# Altium PCB R6Drone.PcbDoc
Units mm, origin at the board's own origin, x right, y up, seen from the top; angles counter-clockwise.
Board outline 40.77 x 57.78 mm, 2 copper layers (Top Layer, Bottom Layer); 40 components, 21 nets, 94 pads, 36 vias.
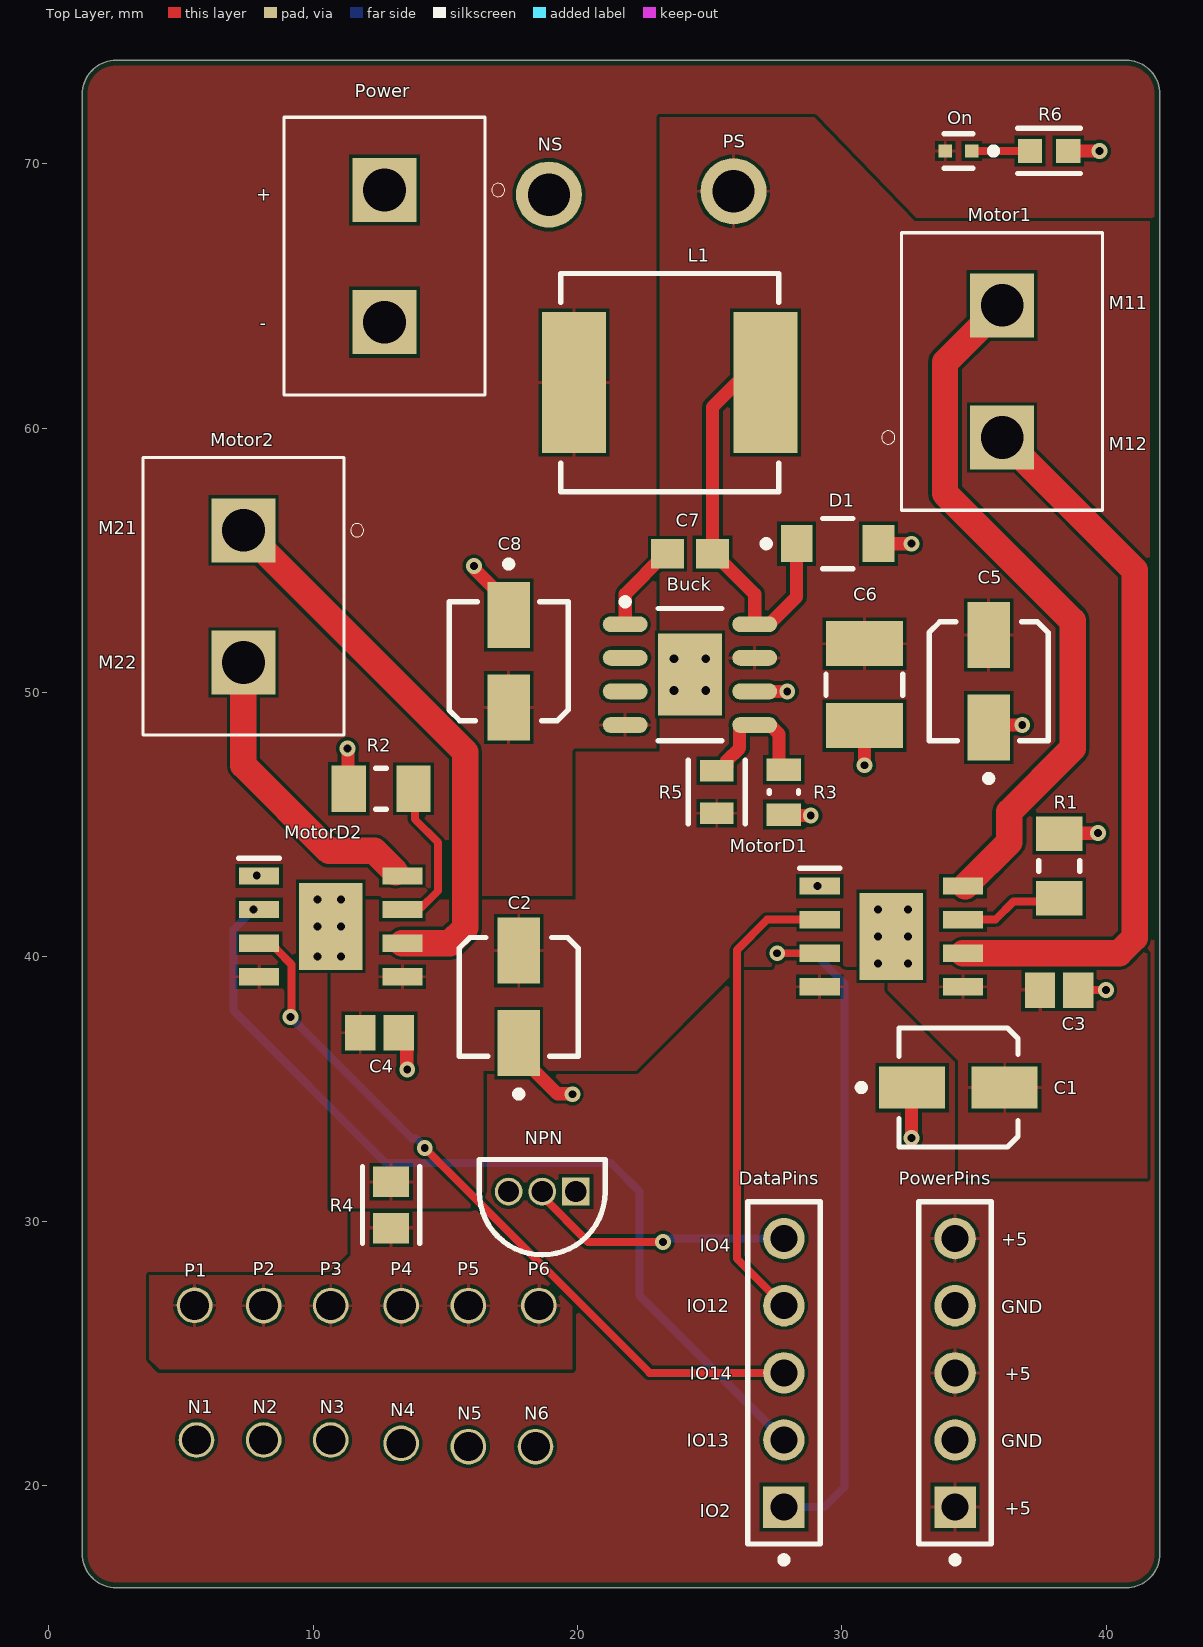
[diagram p0: Top Layer view]
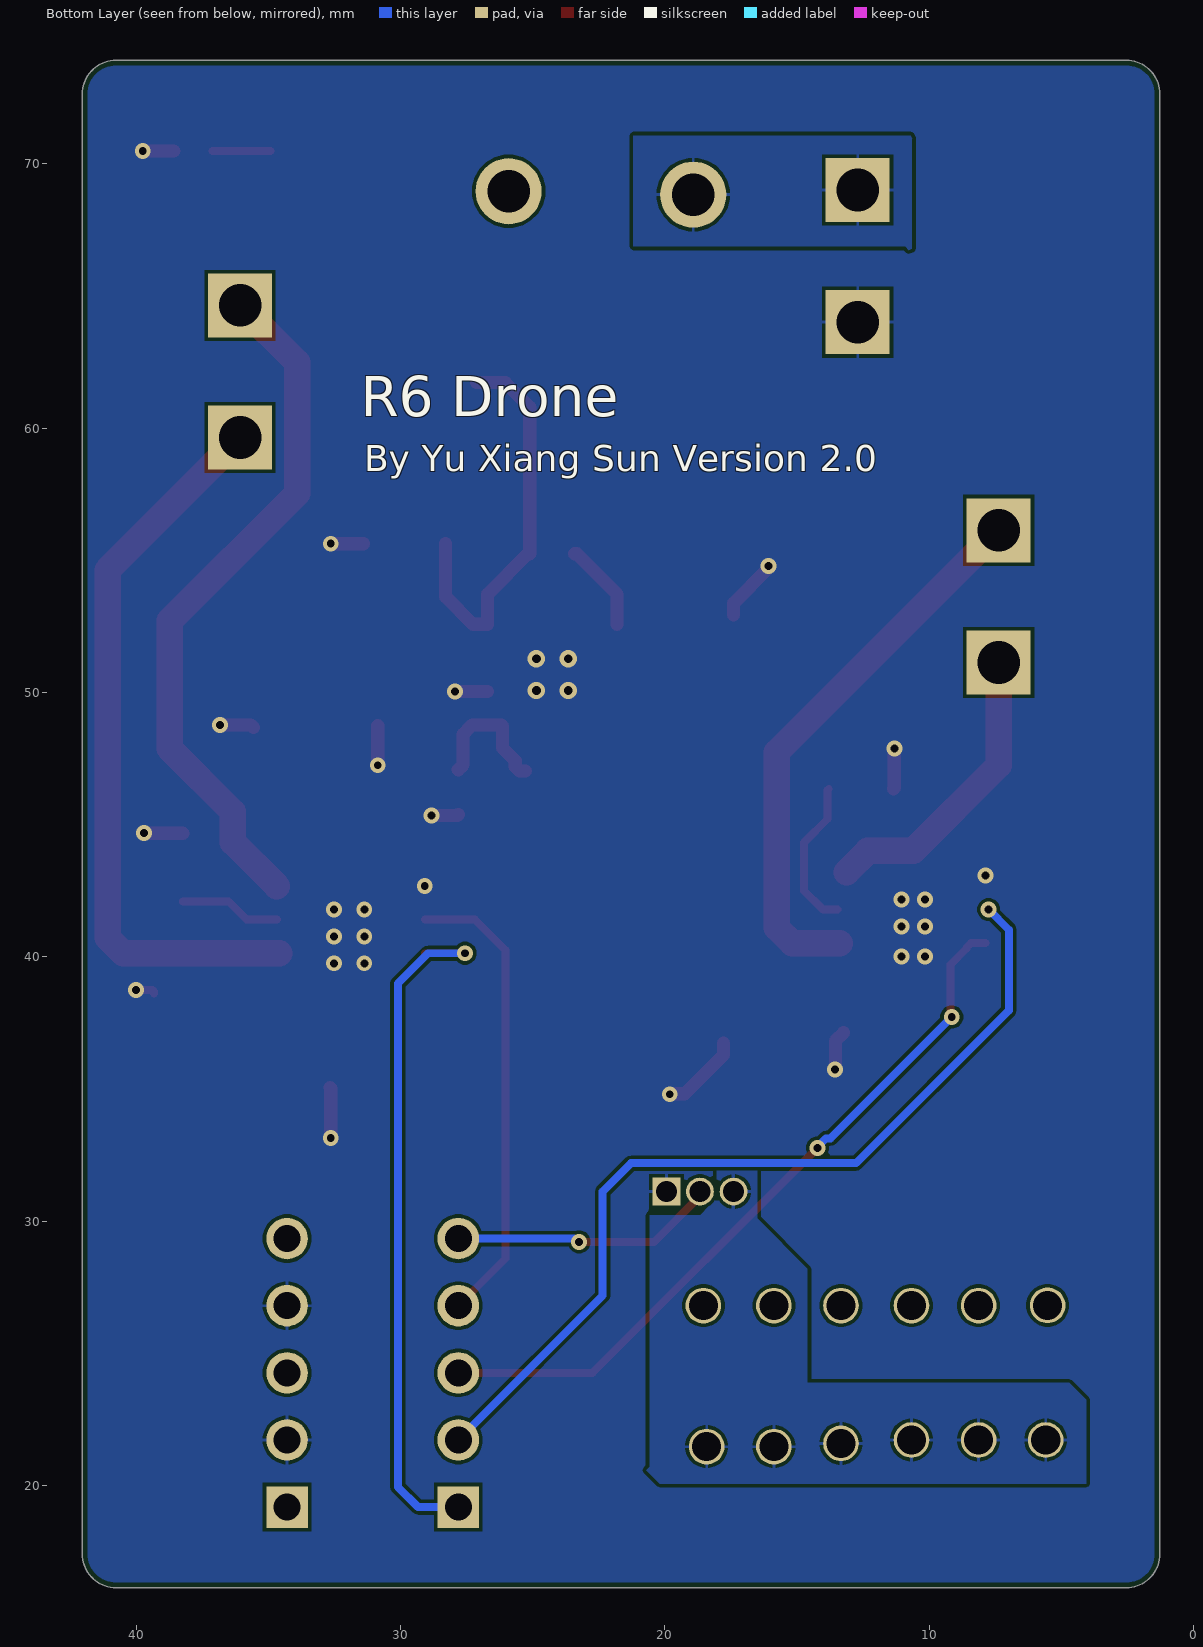
[diagram p1: Bottom Layer view, seen from below]
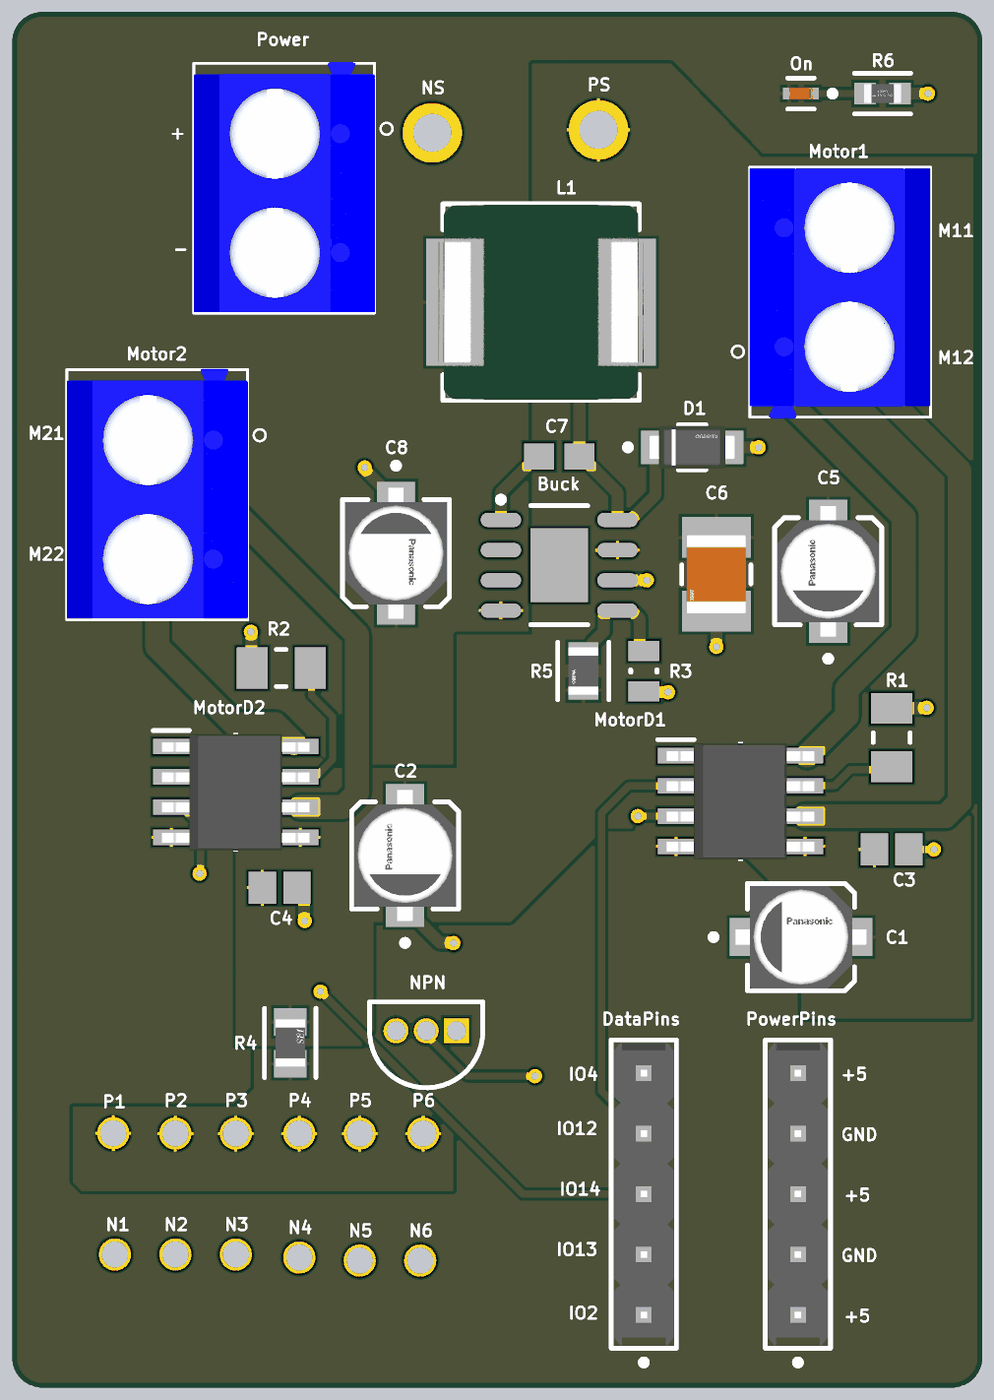
[diagram p2: 3D render of the assembled board from above, using the file's embedded part models]

## Layer stack, top to bottom
Top Solder: solder mask 0.0102, Solder Resist, Dk 3.5
Top Layer: signal copper 0.0356
Dielectric 1: dielectric 0.32, FR-4, Dk 4.8
Bottom Layer: signal copper 0.0356
Bottom Solder: solder mask 0.0102, Solder Resist, Dk 3.5

## Board outline
2.54,16.129 cw(c2.54,17.399) 1.27,17.399 1.27,72.644 cw(c2.54,72.644) 2.54,73.914 40.767,73.914 cw(c40.767,72.644) 42.037,72.644 42.037,17.399 cw(c40.767,17.399) 40.767,16.129

## Design rules (kind name [scope] priority, off if disabled: settings)
BoardOutlineClearance [All] p1: gap=0.2 ignorepadtopadclearanceinfootprint=FALSE
Clearance [All] p1: gap=0.127 ignorepadtopadclearanceinfootprint=FALSE except(0.25: Arc-Hole Track-Hole SMDPad-Hole THPad-Hole Via-Hole Fill-Hole Poly-Hole Region-Hole Text-Hole)
ComponentClearance [All] p1: gap=0.127 collisioncheckmode=3 verticalgap=0.127 showdistances=TRUE
DiffPairsRouting [All] p1: maxlimit=0.254 minlimit=0.127 mostfreqgap=0.127 toplayer_minwidth=0.127 toplayer_maxwidth=25.4 toplayer_prefwidth=0.127 bottomlayer_minwidth=0.127 bottomlayer_maxwidth=25.4 bottomlayer_prefwidth=0.127 maxuncoupledlength=12.7
Height [All] p1: minheight=0 maxheight=1816.048 prefheight=12.7
HoleSize [All] p1: absolutevalues=TRUE maxlimit=6.3 minlimit=0.3 maxpercent=80.000 minpercent=20.000
HoleToHoleClearance [All] p1: gap=0.25 allowstackedmicrovias=FALSE
MinimumAnnularRing [All] p1: minimumring=0.076
MinimumSolderMaskSliver [All] p1: minsoldermaskwidth=0
PlaneClearance [All] p1: clearance=0.127
PlaneConnect PlaneConnectPowerPads [InPadClass('PowerPads')] p1: planeconnectstyle=Direct reliefexpansion=0.508 reliefentries=4 reliefconductorwidth=0.254 reliefairgap=0.254
PlaneConnect [All] p2: pad.planeconnectstyle=Relief pad.reliefexpansion=0.3 pad.reliefentries=4 pad.reliefconductorwidth=0.127 pad.reliefairgap=0.127 via.planeconnectstyle=Direct via.reliefexpansion=0.3 via.reliefentries=4 via.reliefconductorwidth=0.127 via.reliefairgap=0.127
PolygonConnect PolygonConnectPowerPads [All vs (InPadClass('PowerPads'))] p1: connectstyle=Direct reliefconductorwidth=0.254 reliefentries=4 polygonreliefangle="90 Angle" airgapwidth=0.254
PolygonConnect [All] p2: thpad.connectstyle=Relief thpad.reliefconductorwidth=0.127 thpad.reliefentries=4 thpad.polygonreliefangle="90 Angle" thpad.airgapwidth=0.127 smdpad.connectstyle=Relief smdpad.reliefconductorwidth=0.127 smdpad.reliefentries=4 smdpad.polygonreliefangle="90 Angle" smdpad.airgapwidth=0.127 via.connectstyle=Direct via.reliefconductorwidth=0.127 via.reliefentries=4 via.polygonreliefangle="90 Angle" via.airgapwidth=0.127
RoutingVias [All] p1: holewidth=0.3 width=0.6 viastyle="Through Hole" minholewidth=0.3 minwidth=0.6 maxholewidth=0.6 maxwidth=6.6
SilkToSilkClearance [All] p1: silktosilkclearance=0
SilkToSolderMaskClearance [IsPad] p1: minsilkscreentomaskgap=0.127 clearancetoexposedcopper=TRUE
SolderMaskExpansion [All] p1: expansion=0.075 istentingtop=FALSE
SupplyNets "Schematic Supply Nets_2" [InNet('+5')] p1: voltage=0.000
SupplyNets "Schematic Supply Nets_1" [InNet('+9')] p2: voltage=0.000
SupplyNets "Schematic Supply Nets" [InNet('GND')] p3: voltage=0.000
Width [All] p1: maxlimit=25.4 minlimit=0.127 preferedwidth=0.127 minimp=50.000000 maximp=50.000000 favimp=50.000000
20 further rules are at their usual default settings.

## Components (designator, comment, footprint, x,y, rotation, side; value= is the part's Value field where it differs from the comment)
Buck "LM22675QMRE-5.0/NOPB" MRA08B_L 24.257,50.673 r0 top
C1 "100u" FP-FTB-MFG 34.417,35.052 r0 top
C2 "100u" FP-FTB-MFG 17.78,38.481 r90 top
C3 "0.22u" CAPC2013X94X50LL20T25 38.227,38.735 r180 top
C4 "0.22u" CAPC2013X94X50LL20T25 12.509,37.124 r180 top
C5 "100u" FP-FTB-MFG 35.56,50.419 r90 top
C6 "10u" FP-1210-L_3_3_0_4-W_2_5_0-IPC_A 30.861,50.292 r270 top
C7 "10n" CAPC1608X90X35ML15T15 24.257,55.245 r180 top
C8 "100u" FP-FTB-MFG 17.399,51.181 r270 top
D1 "15v 2A" FP-425AB-MFG 29.845,55.626 r0 top
DataPins "Data" FP-22-28-4050-MFG 27.813,24.257 r90 top
L1 "10u" FP-IHLP-3232CZ-FP_2_413x5-MFG 23.495,61.722 r180 top
Motor1 "EBBA-02-C-SS-BU" EBBA-02-C-SS-BU 36.068,59.643 r90 top
Motor2 "EBBA-02-C-SS-BU" EBBA-02-C-SS-BU 7.366,56.134 r270 top
MotorD1 "A4950KLJTR-T" SOIC127P600X170-9N 31.877,40.767 r0 top
MotorD2 "A4950KLJTR-T" SOIC127P600X170-9N 10.668,41.148 r0 top
N1 "Con1.1mm" "PCBComponent_1 - duplicate" 5.08,21.209 r0 top
N2 "Con1.1mm" "PCBComponent_1 - duplicate" 7.62,21.209 r0 top
N3 "Con1.1mm" "PCBComponent_1 - duplicate" 10.16,21.209 r0 top
N4 "Con1.1mm" "PCBComponent_1 - duplicate" 12.827,21.082 r0 top
N5 "Con1.1mm" "PCBComponent_1 - duplicate" 15.367,20.955 r0 top
N6 "Con1.1mm" "PCBComponent_1 - duplicate" 17.907,20.955 r0 top
NPN "2N3904BU" FAIR-TO-92 19.939,31.115 r180 top
NS "2mm hole" PCBComponent_1 18.923,68.834 r0 top
On "Red" FP-HSMC-C280-MFG 34.417,70.485 r180 top
P1 "Con1.1mm" "PCBComponent_1 - duplicate" 5.009,26.304 r0 top
P2 "Con1.1mm" "PCBComponent_1 - duplicate" 7.62,26.289 r0 top
P3 "Con1.1mm" "PCBComponent_1 - duplicate" 10.16,26.289 r0 top
P4 "Con1.1mm" "PCBComponent_1 - duplicate" 12.827,26.289 r0 top
P5 "Con1.1mm" "PCBComponent_1 - duplicate" 15.367,26.289 r0 top
P6 "Con1.1mm" "PCBComponent_1 - duplicate" 18.034,26.289 r0 top
Power "EBBA-02-C-SS-BU" EBBA-02-C-SS-BU 12.7,69.008 r270 top
PowerPins "Power" FP-22-28-4050-MFG 34.29,24.257 r90 top
PS "2mm hole" PCBComponent_1 25.908,68.961 r0 top
R1 "0.15" RESC3216X89X64LL25T25 38.227,43.434 r90 top
R2 "0.15" RESC3216X89X64LL25T25 12.573,46.355 r180 top
R3 "240k" RESC0805(2012)_L 27.813,46.228 r90 top value="240000.00 Ohm"
R4 "30" FP-RMCF0805-IPC_B 12.954,30.607 r90 top
R5 "470k" FP-AT0805-IPC_C 25.273,46.228 r270 top
R6 "10k" FP-RQ731J-IPC_B 37.846,70.485 r0 top

## Footprints (in the part's own frame and the unit in brackets; to place one, negate y for a bottom-side part, rotate by r counter-clockwise, add the part's x,y. Pads: shape width x height; smd on the part's side, far side on the other; paste and mask are expansions set on the pad)
CAPC1608X90X35ML15T15 [mm] "Chip Capacitor, 2-Leads, Body 1.60x0.81mm, IPC Low Density"
  rect 1.25x1.1 smd: 1(-0.85,0) 2(0.85,0)
  body extent -0.88,-0.48 0.87,0.48, height 0.9
CAPC2013X94X50LL20T25 [mm] "Chip Capacitor, 2-Leads, Body 2.01x1.25mm, IPC High Density"
  rect 1.15x1.35 smd: 1(-0.725,0) 2(0.725,0)
  body extent -1.1,-0.72 1.1,0.72, height 0.94
EBBA-02-C-SS-BU [mm]
  rect 2.421x2.421 / inner round 2.421 / far side rect 2.421x2.421 hole 1.614: 1(0,0) 2(5,0)
  silkscreen extent -2.75,-3.8 7.75,4.55, body extent -2.79,-3.79 7.71,3.81, height 10
FAIR-TO-92 [mm] "TO, 3-Leads, Body Dia 4.79mm, Pitch 1.27mm"
  rect 1.05x1.05 hole 0.8 mask+0.05: 1(0,0)
  round 1.05 hole 0.8 mask+0.05: 2(1.27,0) 3(2.54,0)
  silkscreen extent -1.11,-1.21 3.65,2.4, body extent -1.11,-1.21 3.65,2.4, height 5.33
FP-22-28-4050-MFG [mm]
  rect 1.57x1.57 hole 1.02 paste-2539.97 mask+0: 1(-5.08,0)
  round 1.57 hole 1.02 paste-2539.97 mask+0: 2(-2.54,0) 3(0,0) 4(2.54,0) 5(5.08,0)
  silkscreen extent -7.2,-1.37 6.48,1.37, body extent -6.58,-1.47 6.58,1.47, height 0.25
FP-425AB-MFG [mm]
  rect 1.2x1.4 smd paste+0 mask+0: 1(-1.55,0) 2(1.55,0)
  silkscreen extent -2.82,-0.95 0.58,0.95, body extent -2.25,-1.05 2.25,1.05, height 0.25
FP-1210-L_3_3_0_4-W_2_5_0-IPC_A [mm]
  rect 1.703x2.904 smd paste+0 mask+0: 1(-1.55,0) 2(1.55,0)
  silkscreen extent -0.4,-1.45 0.4,1.45, body extent -2.9,-1.95 2.9,1.95, height 0.25
FP-AT0805-IPC_C [mm]
  rect 0.808x1.262 smd paste+0 mask+0: 1(-0.802,0) 2(0.802,0)
  silkscreen extent -1.21,-1.07 1.21,1.07, body extent -1.31,-0.77 1.31,0.77, height 0.25
FP-FTB-MFG [mm]
  rect 2.5x1.6 smd paste+0 mask+0: 1(-1.75,0) 2(1.75,0)
  silkscreen extent -3.8,-2.25 2.25,2.25, body extent -3.25,-2.5 3.25,2.5, height 0.25
FP-HSMC-C280-MFG [mm]
  rect 0.5x0.5 smd paste+0 mask+0: 1(-0.5,0) 2(0.5,0)
  silkscreen extent -1.45,-0.65 0.55,0.65, body extent -0.85,-0.4 0.85,0.4, height 0.25
FP-IHLP-3232CZ-FP_2_413x5-MFG [mil]
  rect 95x210 smd paste+0 mask+0: 1(-142.5,0) 2(142.5,0)
  silkscreen extent -163,-163 163,163, body extent -194,-166 194,166, height 10
FP-RMCF0805-IPC_B [mm]
  rect 1.155x1.362 smd paste+0 mask+0: 1(-0.876,0) 2(0.876,0)
  silkscreen extent -1.45,-1.08 1.45,1.08, body extent -1.7,-0.93 1.7,0.93, height 0.25
FP-RQ731J-IPC_B [mm]
  rect 0.91x0.912 smd paste+0 mask+0: 1(-0.726,0) 2(0.726,0)
  silkscreen extent -1.18,-0.86 1.18,0.86, body extent -1.43,-0.71 1.43,0.71, height 0.25
MRA08B_L [mm] "SOIC, 8-Leads, Body 4.9x3.9mm, Pitch 1.27mm, Exposed Pad, IPC High Density"
  oval 1.7x0.6 smd: 1(-2.45,1.905) 2(-2.45,0.635) 3(-2.45,-0.635) 4(-2.45,-1.905) 5(2.45,-1.905) 6(2.45,-0.635) 7(2.45,0.635) 8(2.45,1.905)
  rect 2.41x3.1 smd: 9(0,0)
  silkscreen extent -2.57,-2.5 1.2,2.88, body extent -2,-2.5 2,2.5, height 1.68
PCBComponent_1 [mm]
  round 2.5 hole 1.6: 1(0,0)
"PCBComponent_1 - duplicate" [mm]
  round 1.35 hole 1.1: 1(0.508,0.508)
RESC0805(2012)_L [mm] "Chip Resistor, Body 2.0x1.3mm, IPC High Density"
  rect 0.85x1.3 smd: 1(-0.85,0) 2(0.85,0)
  silkscreen extent -0.05,-0.55 0.05,0.55, body extent -1.1,-0.67 1.1,0.68, height 0.7
RESC3216X89X64LL25T25 [mm] "Chip Resistor, 2-Leads, Body 3.20x1.60mm, IPC High Density"
  rect 1.3x1.75 smd: 1(-1.225,0) 2(1.225,0)
  silkscreen extent -0.2,-0.77 0.2,0.77, body extent -1.72,-0.92 1.73,0.92, height 0.89
SOIC127P600X170-9N [mm]
  rect 1.525x0.65 smd: 1(-2.712,1.905) 2(-2.712,0.635) 3(-2.712,-0.635) 4(-2.712,-1.905) 5(2.712,-1.905) 6(2.712,-0.635) 7(2.712,0.635) 8(2.712,1.905)
  rect 2.41x3.3 smd: 9(0,0)
  silkscreen extent -3.47,2.58 -1.95,2.58, body extent -3.1,-2.52 3.1,2.48, height 1.51

## Part data
Buck: library part CMP-0069-02125-1, "1A SIMPLE SWITCHER®, Step-Down Voltage Regulator with Precision Enable, 5V Output, Automotive Grade 1, 8-pin PSOP, 250 Reel", Manufacturer="National Semiconductor", PackageTopMarking=NSXYTT*L22675*Q5.0, PowerWise=N, Code_JEDEC=MS-012-AA, ComponentLink1Description="LM22675 Datasheet", ComponentLink1URL=http://www.national.com/ds/LM/LM22675.pdf, ComponentLink2Description="LM22675 Web Page", ComponentLink2URL=http://www.national.com/pf/LM/LM22675.html, ComponentLink3Description="MRA08B Package Page", ComponentLink3URL=http://www.national.com/packaging/folders/mra08b.html, CompType=Switcher, DatasheetVersion=Dec-2010, PackageDescription="Molded, PSOP .193 x .154 x .058in, 8 Lead, .050in Pitch, Large DAP", PackageReference=MRA08B, PackageVersion="revB, Dec-2007", PinCount=8, RoHS=Y
C1 C2 C5 C8: library part CMP-05427-000035-1, "CAP ALUM 10UF 20% 50V SMD", Capacitance=10uF, Case/Package=Radial, Dielectric Material=Aluminium, ESR (Equivalent Series Resistance)=2.3R, Leakage Current=5uA, Max Operating Temperature=105°C, Min Operating Temperature=-55°C, Package Quantity=1, Ripple Current=85mA, Tolerance=20%, Voltage=50V, Construction=Cylindrical, Contact Plating=Tin, Diameter=4mm, Height=5.8mm, Height - Seated (Max)=0.24inch, Lead Diameter=0.65mm, Lead Free="Lead Free", Lead Pitch=1mm, Length=5.8mm, Life (Hours)=2000Hour, Mount="Surface Mount", Number of Pins=2, Packaging="Tape and Reel", Radiation Hardening=No, Ripple Current (AC)=85mA, RoHS Compliant=Yes, Series=FT, Termination=SMD/SMT, Voltage Rating=50V, Voltage Rating (DC)=50V
C3 C4: library part CMP-2007-04183-1, Manufacturer="AVX Interconnect / Elco", Part Number=08051C221JAT2A
C6: library part CMP-1038-02198-3, "CAP CER 10UF 10V X7R 1210", Capacitance=10uF, Case Code (Imperial)=1210, Case Code (Metric)=3225, Dielectric=X7R, Max Operating Temperature=125°C, Min Operating Temperature=-55°C, Package Quantity=1, Tolerance=10%, Voltage=10V, Case/Package=1210, Construction=Flat, Depth=2.5mm, Dissipation Factor=5%, Height=2.79mm, Lead Free="Lead Free", Length=3.2mm, Mount="Surface Mount", Packaging="Tape and Reel", Radiation Hardening=No, REACH SVHC="No SVHC", RoHS Compliant=Yes, Series=1210, Termination=SMD/SMT, Thickness=0.11inch, Voltage Rating=10V, Voltage Rating (DC)=10V, Width=0.098inch
C7: library part CMP-2006-04466-1, Manufacturer="AVX Interconnect / Elco", Part Number=06035G103ZAT2A
D1: library part CMP-00278-84331612-1, "SS22FA 2 A, 20 V Surface Mount Schottky Barrier Rectifiers", Average Rectified Current=2A, Manufacturer Lifecycle Status=ACTIVE, Max Forward Surge Current (Ifsm)=50A, Max Repetitive Reverse Voltage (Vrrm)=20V, Element Configuration=Single, Forward Current=2A, Lifecycle Status=Production, Max Reverse Voltage (DC)=20V, Mount="Surface Mount", NexarPartId=84331612, RoHS=Compliant, Schedule B="8541100080, 8541100080", Weight=19mg
DataPins PowerPins: library part CMP-00257-00278173-1, "22-28-4050 KK® 254 Breakaway Header, Vertical, 5 Circuits, Tin (Sn) Plating, Mating Pin Length 6.09mm", Color=Black, Contact Resistance=20mΩ, Current Rating=4A, Flammability Rating="UL94 V-0", Max Operating Temperature=75°C, Max Voltage Rating (DC)=250.25kV, Min Operating Temperature=0°C, Voltage Rating=250V, Connector Type="Male Pin", Contact Material=Brass, Contact Mating Length=6.096mm, Contact Plating=Tin, Gender=Male, Glow Wire Compliant=Non-compliant, Height=2.29mm, Housing Color=Black, Housing Material=Thermoplastic, Lead Free="Lead Free", Lead Pitch=2.54mm, Length=12.7mm, Mount="Through Hole", NexarPartId=278173, Number of Circuits=5, Number of Contacts=5, Number of Positions=5, Number of Rows=1, Orientation=Vertical, Packaging=Bulk, Pitch=2.54mm, Radiation Hardening=No, REACH SVHC=Unknown, RoHS=Compliant, Schedule B=8536694040, Termination=Solder, Voltage Rating (DC)=250V, Width=2.49mm
L1: library part CMP-02424-000796-1, "Commercial Inductors, High Saturation Series 10uH 4.7A 71.2mΩ 20%", Case/Package=3232, Current Rating=4.7A, DC Resistance (DCR)=71.2mR, Inductance=10uH, Inductance Tolerance=20%, Max DC Current=8.2A, Max Operating Temperature=125°C, Min Operating Temperature=-55°C, Package Quantity=1000, Self Resonant Frequency=15MHz, Test Frequency=100kHz, Core Material=Metal, Depth=8.94mm, Height=3mm, Height - Seated (Max)=0.118inch, Lead Free="Lead Free", Length=8.64mm, Military Standard=Not, Mount="Surface Mount", Number of Pins=2, Packaging="Tape and Reel", Radiation Hardening=No, Rated Current-Max=4.7A, RMS Current (Irms)=4.7A, RoHS Compliant=Yes, Saturation Current=8.2A, Series=IHLP-3232CZ-01, Shielding=Shielded, Termination=SMD/SMT, Tolerance=20%, Width=0.322inch
Motor1 Motor2 Power: library part CMP-002-00072-2, "Terminal block, EURO BLOCK, slotted screw, 5.00mm pitch, blue, 2 position", Case/Package=None, Check_prices=https://www.snapeda.com/parts/EBBA-02-C-SS-BU/Adam+Tech/view-part/?ref=eda, Component Type=Standard, Design Item ID=EBBA-02-C-SS-BU, MF="Adam Tech", MP=EBBA-02-C-SS-BU, Pins=2, SnapEDA_Link=https://www.snapeda.com/parts/EBBA-02-C-SS-BU/Adam+Tech/view-part/?ref=snap, Source=EBBA-02-C-SS-BU.SchLib
MotorD1 MotorD2: "Integrated Circuit", Manufacturer_Name="Allegro Microsystems", Mouser Part Number=250-A4950KLJTR-T, Arrow Part Number=A4950KLJTR-T, Arrow Price/Stock=https://www.arrow.com/en/products/a4950kljtr-t/allegro-microsystems?region=nac, Datasheet Link=https://www.allegromicro.com/~/media/Files/Datasheets/A4950-Datasheet.ashx, Height=1.7mm, Manufacturer_Part_Number=A4950KLJTR-T, Mouser Price/Stock=https://www.mouser.co.uk/ProductDetail/Allegro-MicroSystems/A4950KLJTR-T?qs=pUKx8fyJudCer0p7h%2FGGXA%3D%3D
N1 N2 N3 N4 N5 N6 P1 P2 P3 P4 P5 P6: library part "Connector 1.1mm", "Connector Pad 1.1mm"
NPN: library part CMP-2000-04944-1, "NPN General-Purpose Amplifier, 40 V VCEO, 0.2 A, -55 to 150 degC, 2-Pin TO-92, RoHS, Bulk", Manufacturer=FairchildSemiconductor, Maximum Collector Base Voltage=60V, Maximum Collector Emitter Saturation Voltage=0.2@1mA@10mA, Maximum Collector Emitter Voltage=40V, Maximum DC Collector Current=0.2A, Maximum Operating Frequency=300(Min)MHz, Maximum Power Dissipation=625mW, Minimum DC Current Gain=40@0.1mA@1V, Operating Temperature=-55to150degC, Package=3TO-92, Package Description="3-Pin Transistor Outline Package, Body Dia 4.79 mm, Pitch 1.27 mm", Package Reference=TO-92, Category=GPBJT, Datasheet URL=https://datasheet.ciiva.com/4722/2n3904-82270-4722369.pdf, Datasheet Version="Rev. 1.1.0, 10/2014", Manufacturer URL=https://www.fairchildsemi.com/, Mounting=ThroughHole, Packaging=Bulk, Pin Count=3, Rad Hard=No, Type=NPN
NS PS: library part "Connector 2mm", "2mm Connector Hole"
On: library part CMP-18399-000022-1, "LED RED DIFFUSED 0402 SMD", Case Code (Imperial)=0402, Case Code (Metric)=1005, Forward Current=20mA, Forward Voltage=1.9V, Lens Color=White, Max Operating Temperature=85°C, Max Power Dissipation=60mW, Min Operating Temperature=-40°C, Package Quantity=4000, Reverse Voltage=5V, Case/Package=0402, Color=Red, Contact Plating=Gold, Depth=0.5mm, Dominant Wavelength=626nm, Height=0.4mm, Illumination Color=Red, Lead Free="Lead Free", Length=1mm, Lens Style=Diffused, Lens Transparency=Diffused, Luminous Flux=155lm, Luminous Intensity=90mcd, Mount="Surface Mount", Number of Elements=1, Number of LEDs=1, Number of Pins=2, Packaging="Tape and Reel", Power Dissipation=60mW, Power Rating=60mW, Radiation Hardening=No, REACH SVHC="No SVHC", Test Current=20mA, Viewing Angle=130°, Wavelength=626nm, Width=0.5mm
R1 R2: library part CMP-2003-04328-1, Manufacturer="Vishay Dale", Part Number=WSL1206R1500FEA
R3: library part CMP-1013-00777-1, "240K 0.125W 1% 0805 (2012 Metric)  SMD", Case-EIA=0805, Case-Metric=2012, Power="0.125 W", Tolerance="1 %", Technology=SMT
R4: library part CMP-26527-003048-1, "30Ω ±5% 0.125W 0805 Thick Film Chip Resistor AEC-Q200 compliant", Case Code (Imperial)=0805, Case Code (Metric)=2012, Max Operating Temperature=155°C, Max Power Dissipation=125mW, Min Operating Temperature=-55°C, Resistance=30R, Resistor Type="Thick Film", Temperature Coefficient=200ppm/°C, Tolerance=5%, Case/Package=0805, Construction=Rectangular, Contact Plating=Tin, Depth=1.25mm, Features="Automotive AEC-Q200", Height=0.026inch, Length=0.079inch, Military Standard=Not, Mount="Surface Mount", Number of Terminations=2, Packaging="Tape and Reel", Radiation Hardening=No, RoHS Compliant=Yes, Series=RMCF, Width=0.049inch
R5: library part CMP-03412-042604-1, "Thin Film Chip Resistors Automotive Grade 470kΩ 0.1% 25ppm/°C 0805"
R6: library part CMP-03211-011294-1, "RQ73 0603 10KΩ  0.15W 10ppm/°C 0.1% 75V"

## Via types
v1: diameter 0.6, hole 0.3, Top Layer to Bottom Layer, 32 vias
v2: diameter 0.66, hole 0.33, Top Layer to Bottom Layer, tented top, 4 vias

## Nets (pads, with @x,y where several pads share a name; then routed paths per layer and width w, separated by ;. In a path a pad name is that pad's centre, name@x,y a point inside that pad or via, vN(x,y) a via of type N, cw(c..) or ccw(c..) an arc to the next point about the centre after c; other vN are vias at no path point)
+5: Buck.4 C8.2 L1.2 MotorD1.4 MotorD2.4 On.2 PowerPins.1 PowerPins.3 PowerPins.5
+9: Buck.7 C1.2 C2.2 C3.2 C4.2 C5.2 C6.1 MotorD1.5 MotorD2.5 PS.1 R4.2 R5.2
GND: Buck.6 Buck.9 C1.1 C2.1 C3.1 C4.1 C5.1 C6.2 C8.1 D1.2 MotorD1.1 MotorD1.9 MotorD2.1 MotorD2.9 NPN.1 Power.2 PowerPins.2 PowerPins.4 R1.2 R2.2 R3.1 R6.2 | length 20.3
  Top Layer w0.3: C3.1@39.333,38.608 39.333,38.691 39.377,38.735 v1(40.005,38.735)
  Top Layer w0.5: MotorD2.1@7.868,43.053 v1(7.868,43.078) ; v1(11.303,47.879) 11.322,47.86 11.322,46.381 R2.2 ; C4.1 13.543,36.815 13.543,35.746 v1(13.563,35.727) ; v1(16.083,54.779) 16.102,54.76 16.102,54.678 17.399,53.381 C8.1 ; C2.1 17.78,36.281 19.244,34.817 19.793,34.817 v1(19.812,34.798) ; Buck.6 v1(27.94,50.038) ; R3.1 27.852,45.339 v1(28.829,45.339) ; MotorD1.1@29.077,42.672 v1(29.083,42.672) ; v1(30.861,47.244) C6.2 ; D1.2 v1(32.639,55.626) ; v1(32.639,33.147) 32.639,35.024 C1.1 ; C5.1 35.659,48.768 v1(36.83,48.768) ; R1.2 38.238,44.67 39.69,44.67 v1(39.701,44.682) ; R6.2 v1(39.751,70.485)
  other v1: 31.369,39.751 32.512,39.751 10.16,40.005 11.049,40.005 31.369,40.767 32.512,40.767 10.16,41.148 11.049,41.148 31.369,41.783 32.512,41.783 10.16,42.164 11.049,42.164
  other v2: 23.657,50.073 24.857,50.073 23.657,51.273 24.857,51.273
NetBuck_1: Buck.1 C7.2 | length 3.4
  Top Layer w0.5: Buck.1 21.807,53.72 23.332,55.245 C7.2
NetBuck_5: Buck.5 R3.2 R5.1 | length 5.3
  Top Layer w0.5: R5.1 25.5,47.03 25.654,47.184 25.654,47.411 26.138,47.895 26.138,48.722 26.184,48.768 27.284,48.768 27.334,48.718 27.34,48.718 27.633,48.425 27.633,47.253 27.808,47.078 R3.2
NetBuck_8: Buck.8 C7.1 D1.1 L1.1 | length 15.3
  Top Layer w0.5: C7.1 25.107,60.794 26.035,61.722 L1.1 ; C7.1@25.182,55.245 26.707,53.72 Buck.8 27.257,52.578 28.295,53.616 D1.1
NetDataPins_1: DataPins.1 MotorD1.3 | length 26.2
  Top Layer w0.3: v1(27.559,40.132) MotorD1.3@29.077,40.132
  Bottom Layer w0.3: v1(27.559,40.132) 28.956,40.132 30.099,38.989 30.099,19.939 29.337,19.177 DataPins.1
NetDataPins_2: DataPins.2 MotorD2.2 | length 34
  Bottom Layer w0.3: v1(7.747,41.783) 6.985,41.021 6.985,37.965 12.761,32.189 21.278,32.189 22.352,31.115 22.352,27.178 DataPins.2
NetDataPins_3: DataPins.3 MotorD2.3 | length 28
  Top Layer w0.3: MotorD2.3@7.868,40.513 8.418,40.513 8.593,40.338 8.593,40.302 9.186,39.709 9.186,37.761 v1(9.144,37.719) ; v1(14.224,32.766) 22.733,24.257 DataPins.3@27.877,24.257
  Bottom Layer w0.3: v1(9.144,37.719) 12.7,34.163 13.734,33.129 13.898,33.129 14.224,32.803 v1(14.224,32.766)
NetDataPins_4: DataPins.4 MotorD1.2 | length 18.3
  Top Layer w0.3: DataPins.4@27.749,26.86 DataPins.4@28.194,27.305 ; DataPins.4 26.035,28.575 26.035,40.259 27.178,41.402 MotorD1.2@29.077,41.402
NetDataPins_5: DataPins.5 NPN.2 | length 10.1
  Top Layer w0.3: NPN.2 18.669,30.943 20.402,29.21 v1(23.241,29.21)
  Bottom Layer w0.3: v1(23.241,29.21) 23.322,29.21 23.449,29.337 DataPins.5
NetMotor1_1: Motor1.1 MotorD1.6 | length 27.7
  Top Layer w1: MotorD1.6 40.497,40.132 41.083,40.718 41.083,54.628 Motor1.1
NetMotor1_2: Motor1.2 MotorD1.8 | length 26.5
  Top Layer w1: MotorD1.8@34.677,42.672 36.344,44.339 36.344,45.488 38.735,47.879 38.735,52.705 33.909,57.531 33.909,62.484 Motor1.2
NetMotor2_1: Motor2.1 MotorD2.6 | length 21.1
  Top Layer w1: Motor2.1 15.763,47.737 15.763,41.099 15.177,40.513 MotorD2.6
NetMotor2_2: Motor2.2 MotorD2.8 | length 11.3
  Top Layer w1: Motor2.2 7.366,47.244 10.607,44.003 12.318,44.003 MotorD2.8@13.118,43.204
NetMotorD1_7: MotorD1.7 R1.1 | length 3.8
  Top Layer w0.3: MotorD1.7@34.677,41.402 34.689,41.414 35.826,41.414 36.502,42.09 R1.1@38.239,42.09
NetMotorD2_7: MotorD2.7 R2.1 | length 5.8
  Top Layer w0.3: MotorD2.7@13.468,41.783 14.018,41.783 14.732,42.497 14.732,44.323 13.849,45.206 13.849,46.304 R2.1
NetN1_1: N1.1 N2.1 N3.1 N4.1 N5.1 N6.1 NPN.3
NetNS_1: NS.1 Power.1
NetOn_1: On.1 R6.1 | length 2.2
  Top Layer w0.3: On.1 R6.1
NetP1_1: P1.1 P2.1 P3.1 P4.1 P5.1 P6.1 R4.1
pads on no net: Buck.2 Buck.3

## Polygon pours and split planes (outlines as drawn)
+5 on Top Layer "+5_L01_P007" (solid, remove dead copper, pour order 7): -2.413,89.154 -2.159,88.9 42.432,88.902 43.815,-16.002 43.942,-16.129 -2.413,-16.129
+9 on Top Layer "+9_L01_P004" (solid, remove dead copper, pour order 4): 23.114,49.657 23.114,47.752 19.939,47.752 19.939,42.164 11.938,42.164 10.668,40.894 10.668,35.687 10.668,30.48 16.129,30.48 16.447,30.797 16.447,35.687 22.225,35.687 26.162,39.624 31.75,39.624 31.75,38.735 34.417,36.068 34.417,31.623 41.559,31.623 41.559,49.419 41.656,49.403 41.656,67.818 32.766,67.818 28.956,71.755 23.114,71.755
NetP1_1 on Top Layer "NETP1_1_L01_P005" (solid, remove dead copper, pour order 5): 11.43,30.48 16.383,30.48 19.812,27.051 19.812,24.384 4.191,24.384 3.81,24.765 3.81,27.94 10.668,27.94 11.43,28.702 11.43,29.591
GND on Bottom Layer "GND_L02_P008" (solid, remove dead copper, pour order 8): -1.359,88.644 -0.51,88.644 0.127,89.281 0.381,89.027 42.545,89.027 43.942,87.63 43.942,-16.129 -1.778,-16.129
NetNS_1 on Bottom Layer "NETNS_1_L02_P006" (solid, remove dead copper, pour order 6): 10.648,66.621 10.902,66.875 21.189,66.875 21.189,71.066 10.521,71.066 10.648,70.939
NetN1_1 on Bottom Layer "NETN1_1_L02_P001" (solid, remove dead copper, pour order 1): 16.51,32.004 16.51,30.099 14.605,28.194 14.605,23.876 4.699,23.876 4.064,23.241 4.064,20.066 20.193,20.066 20.701,20.574 20.574,20.701 20.574,30.226 18.665,30.226 18.034,30.857 18.034,32.131

## Silkscreen, mask and mechanical layers (free items; w line width, h text height)
Top Overlay:
  text "+" at 7.847,68.597 h0.5
  text "M11" at 40.105,64.489 h0.5
  text "-" at 7.974,63.731 h0.5
  text "M12" at 40.105,59.155 h0.5
  text "M21" at 1.878,55.98 h0.5
  text "M22" at 1.878,50.9 h0.5
  text "+5" at 36.041,29.056 h0.5
  text "IO4" at 24.638,28.829 h0.5
  text "IO12" at 24.13,26.543 h0.5
  text "GND" at 36.041,26.516 h0.5
  text "IO14" at 24.257,24.003 h0.5
  text "+5" at 36.168,23.976 h0.5
  text "IO13" at 24.13,21.463 h0.5
  text "GND" at 36.041,21.436 h0.5
  text "+5" at 36.168,18.896 h0.5
  text "IO2" at 24.638,18.796 h0.5
Bottom Overlay:
  text "R6 Drone" at 31.496,60.452 h1.52
  text "By Yu Xiang Sun Version 2.0" at 31.369,58.372 h1
Mechanical 1:
  lines w0.254: 1.27,17.399 ccw(c2.54,17.399) 2.54,16.129 40.767,16.129 ccw(c40.767,17.399) 42.037,17.399 42.037,72.644 ccw(c40.767,72.644) 40.767,73.914 12.7,73.914 2.54,73.914 ccw(c2.54,72.644) 1.27,72.644 1.27,17.399